# Altium PCB LED-PCB.PcbDoc
Units mil, origin at the board's own origin, x right, y up, seen from the top; angles counter-clockwise.
Board outline 620 x 780 mil, 2 copper layers (Top Layer, Bottom Layer); 1 components, 2 nets, 7 pads, 0 vias.
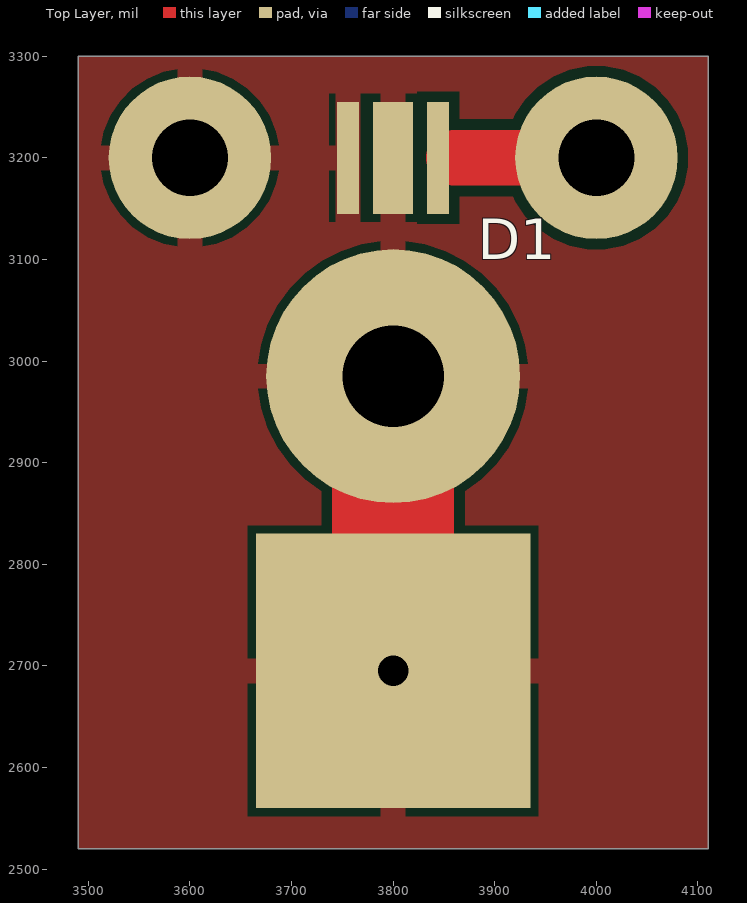
[diagram p0: Top Layer view]
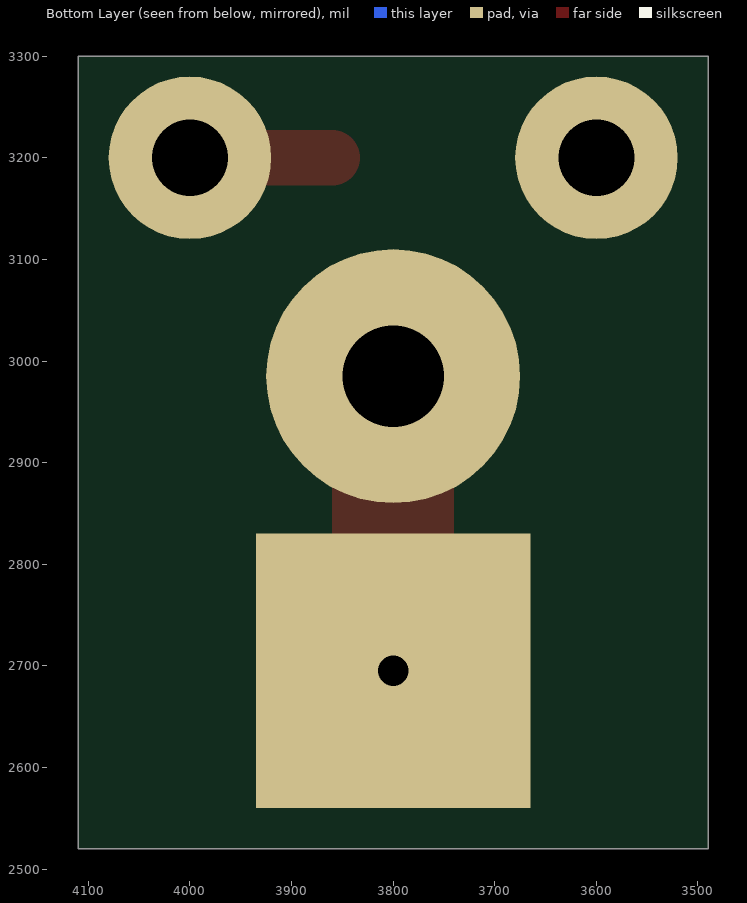
[diagram p1: Bottom Layer view, seen from below]

## Layer stack, top to bottom
Top Solder: solder mask 0.4, Solder Resist, Dk 3.5
Top Layer: signal copper 1.4
Dielectric 1: dielectric 12.6, FR-4, Dk 4.8
Bottom Layer: signal copper 1.4
Bottom Solder: solder mask 0.4, Solder Resist, Dk 3.5

## Board outline
3490,3300 4110,3300 4110,2520 3490,2520

## Design rules (kind name [scope] priority, off if disabled: settings)
Clearance [All] p1: gap=10 ignorepadtopadclearanceinfootprint=FALSE
PlaneClearance [All] p1: clearance=15
PolygonConnect [All] p1: connectstyle=Relief reliefconductorwidth=25 reliefentries=4 polygonreliefangle="90 Angle" airgapwidth=8
RoutingVias [All] p1: holewidth=28 width=50 viastyle="Through Hole" minholewidth=28 minwidth=50 maxholewidth=28 maxwidth=50
SolderMaskExpansion [All] p1: expansion=0 istentingtop=FALSE
SupplyNets "Schematic Supply Nets_1" [InNet('GND')] p1: voltage=0.000
SupplyNets "Schematic Supply Nets" [InNet('VCC')] p2: voltage=0.000
Width POWER_5A [InNet('VCC')] p1: maxlimit=130 minlimit=100 preferedwidth=120 minimp=50.000000 maximp=50.000000 favimp=50.000000
Width GND_5A [InNet('GND')] p2: maxlimit=60 minlimit=50 preferedwidth=55 minimp=50.000000 maximp=50.000000 favimp=50.000000
Width [All] p3: maxlimit=10 minlimit=10 preferedwidth=10
29 further rules are at their usual default settings.

## Components (designator, comment, footprint, x,y, rotation, side; value= is the part's Value field where it differs from the comment)
D1 "OSRAM SFH 4715B, 850 nm infrared emitter Pin 1 cathode; pin 2 anode. Package SFH4715B, max component height 2.29 mm." SFH4715B 3800,3200 r270 top

## Footprints (in the part's own frame and the unit in brackets; to place one, negate y for a bottom-side part, rotate by r counter-clockwise, add the part's x,y. Pads: shape width x height; smd on the part's side, far side on the other; paste and mask are expansions set on the pad)
SFH4715B [mm]
  rect 2.8x0.55 smd paste+0 mask+0: 1(0,1.125) 2(0,-1.125)
  rect 2.8x1 smd paste+0 mask+0: 2(0,0)

## Part data
D1: library part SFH4715B, MANUFACTURER="ams OSRAM", MPN="SFH 4715B", PACKAGE_DRAWING=C63062-A4141-A1...-12, DATASHEET_LAND_PATTERN=E062.3010.91-06, DeviceSetName=SFH4715B, GateName_1=G$1, LibraryName=OSRAM_SFH4715B_Altium_Import_v3, Package=SFH4715B, SymbolName_1=SFH4715B

## Free pads (board coordinates)
  rect 270x270 hole 30: 2(3800,2695)
  round 160 hole 75: 5(3600,3200) 6(4000,3200)
  round 250 hole 100: 7(3800,2985)

## Nets (pads, with @x,y where several pads share a name; then routed paths per layer and width w, separated by ;. In a path a pad name is that pad's centre, name@x,y a point inside that pad or via, vN(x,y) a via of type N, cw(c..) or ccw(c..) an arc to the next point about the centre after c; other vN are vias at no path point)
GND: D1.1 pad.6 | length 140
  Top Layer w55: 3860,3200 pad.6
VCC: D1.2 pad.2 pad.5 pad.7 | length 336
  Top Layer w120: pad.5 pad.5@3607.65,3192.35 ; pad.7@3775.13,3009.87 pad.7 pad.2

## Polygon pours and split planes (outlines as drawn)
VCC on Top Layer "VCC_L01_P000" (solid, pour order 0): 3490,3300 4110,3300 4110,2520 3490,2520

## Silkscreen, mask and mechanical layers (free items; w line width, h text height)
Mechanical 3:
  text "-" at 3980,3050.01 h60
  text "+" at 3580,3040 h60